# Altium PCB PCB_BDD.PcbDoc (part 2 of 2)
Units mm, origin at the board's own origin, x right, y up, seen from the top; angles counter-clockwise.
Board outline 40 x 35 mm, 2 copper layers (Top Layer, Bottom Layer); 30 components, 19 nets, 78 pads, 51 vias.
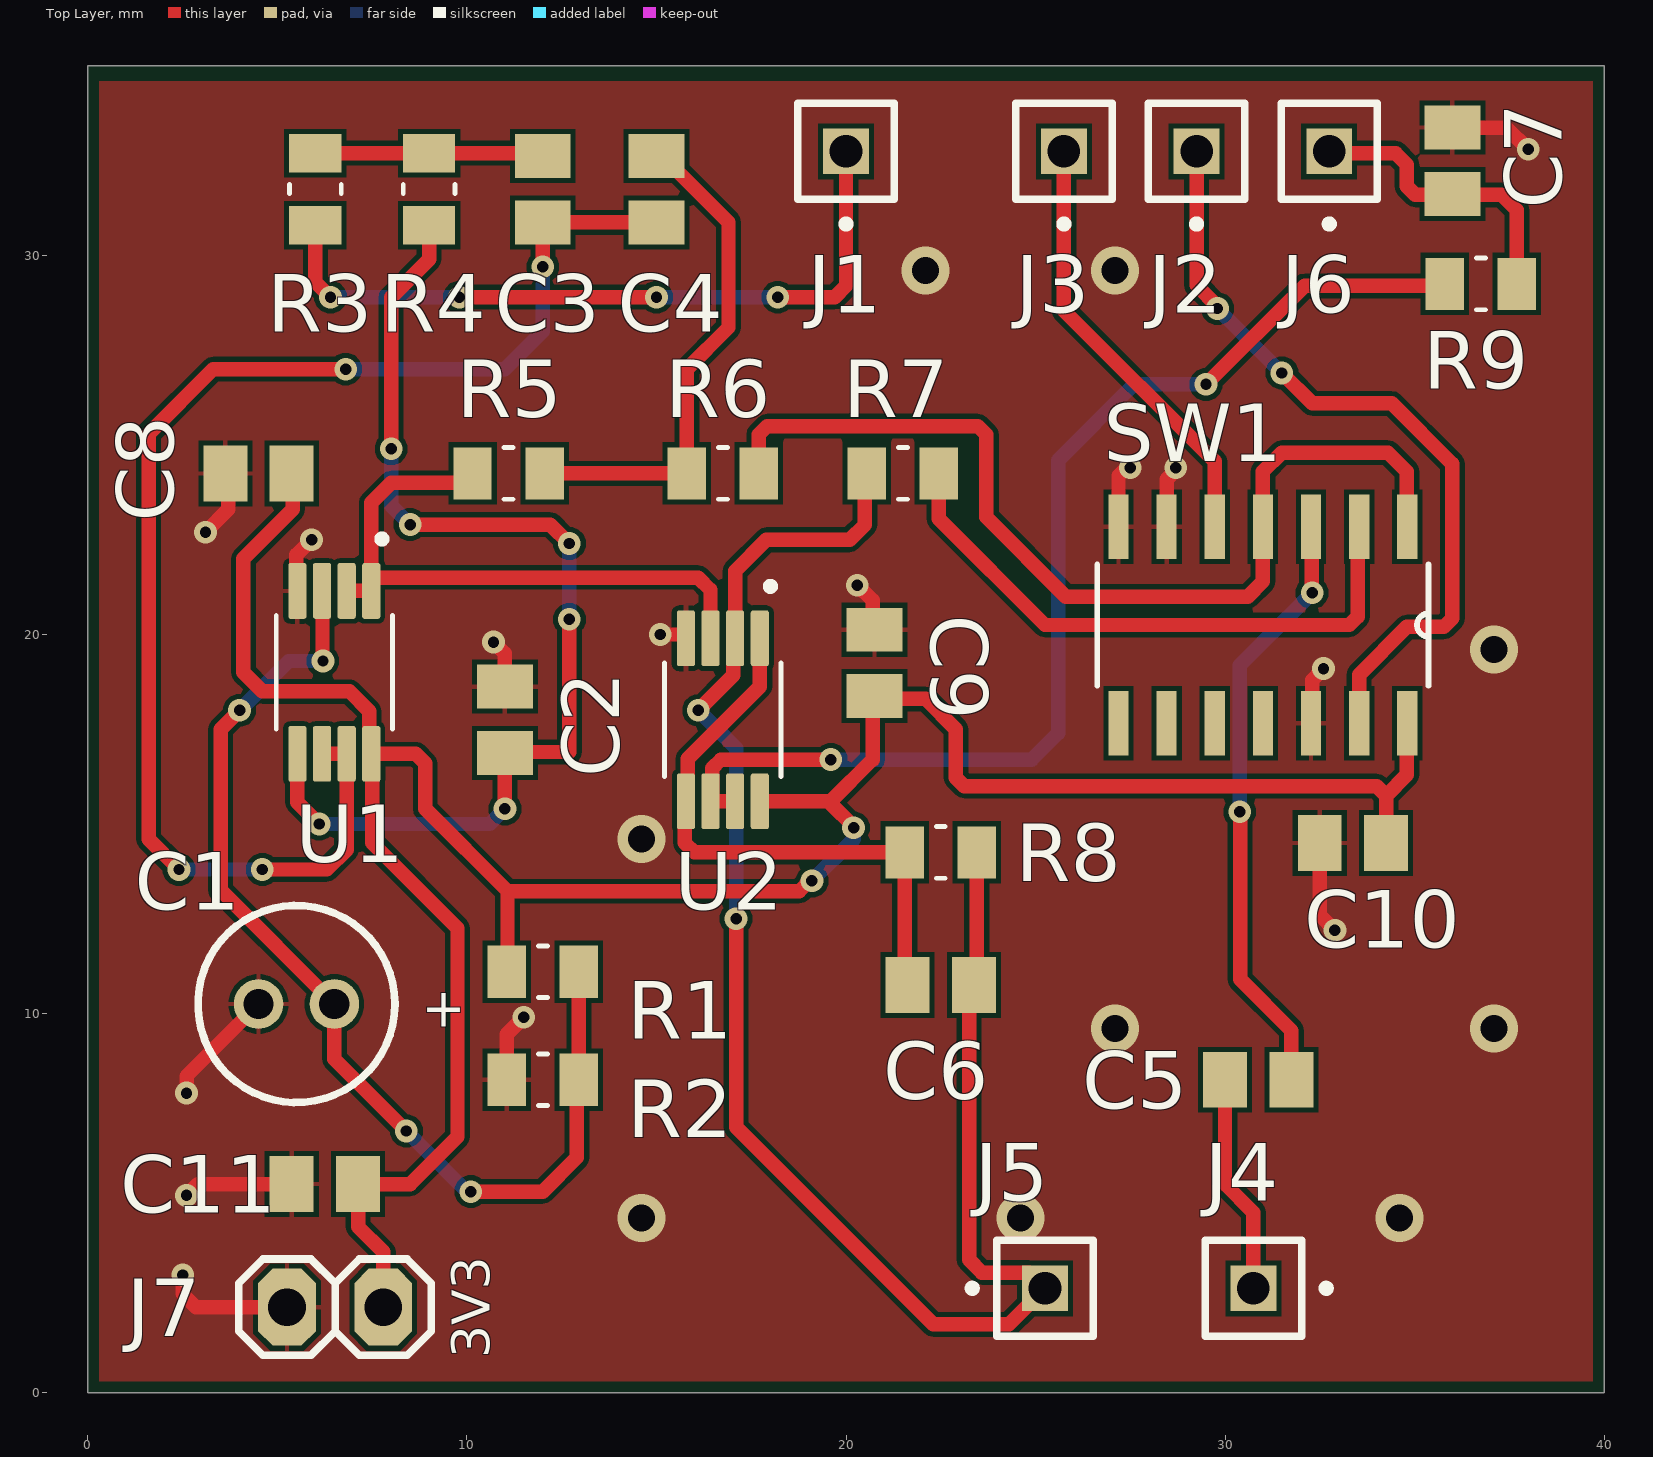
[diagram p0: Top Layer view]

## Part data (continued)
J7: "Female, 2 C, Straight .100\" CC; 3.20mm Tail, No Mounting; PBT, Phos. Bronze, 105 C", Color=Black, Current Rating=3A, Dielectric Material=Polyester, Manufacturer=Sullins, Max Operating Temperature=105°C, Min Operating Temperature=-40°C, Supplier Part Number=S7035-ND, Voltage Rating=250V, Category="Card Edge Connectors", ComponentLink1Description=https://datasheet.octopart.com:443/PPPC021LFBN-RC-Sullins-datasheet-138810743.pdf?src-supplier=IHS, ComponentLink1URL=https://datasheet.octopart.com:443/PPPC021LFBN-RC-Sullins-datasheet-138810743.pdf?src-supplier=IHS, ComponentLink2Description=https://datasheet.octopart.com:443/PPPC021LFBN-RC-Sullins-datasheet-83216130.pdf?src-supplier=Upverter, ComponentLink2URL=https://datasheet.octopart.com:443/PPPC021LFBN-RC-Sullins-datasheet-83216130.pdf?src-supplier=Upverter, ComponentLink3Description=https://datasheet.octopart.com:443/PPPC021LFBN-RC-Sullins-datasheet-41308905.pdf?src-supplier=Future+Electronics, ComponentLink3URL=https://datasheet.octopart.com:443/PPPC021LFBN-RC-Sullins-datasheet-41308905.pdf?src-supplier=Future+Electronics, ComponentLink4Description=https://datasheet.octopart.com:443/PPPC021LFBN-RC-Sullins-datasheet-12511165.pdf?src-supplier=Future+Electronics, ComponentLink4URL=https://datasheet.octopart.com:443/PPPC021LFBN-RC-Sullins-datasheet-12511165.pdf?src-supplier=Future+Electronics, Connector Type="Header, Socket", Contact Material="Gold, Nickel", Contact Plating=Gold, Export Control Classification Number (ECCN) Code=EAR99, Gender=Female, Harmonized Tariff Schedule (HTS) Code=8536.69.40.40, Height=8.7mm, Housing Material=Plastic, Introduction Date=2008-05-14, Lead Free="Lead Free", Length=5.58mm, Lifecycle Status=Production, Manufacturer Part Number=PPPC021LFBN-RC, Mounting Technology="Through Hole", Number of Contacts=2, Number of Positions=2, Number of Rows=1, Orientation=Straight, Packaging=Bulk, Pitch=2.54mm, Pricing="1=0.28, 10=0.234, 100=0.1984, 500=0.17706, 1000=0.16859, 5000=0.15048, 10000=0.1433 (USD)", REACH SVHC=Unaffected, RoHS=Compliant, Stock=38153, Supplier=DigiKey, Terminal Pitch=2.54mm, Termination=Solder, Width=2.5mm
R1 R2 R3 R4: library part RMCF0805FT10K0, "RES 10K OHM 1% 1/8W 0805", Case Code (Imperial)=0805, Case Code (Metric)=2012, Manufacturer="Stackpole Electronics", Manufacturer Package Identifier="0805 (2012 metric)", Max Operating Temperature=155°C, Max Power Dissipation=125mW, Min Operating Temperature=-55°C, Ratings=AEC-Q200, Supplier Part Number=RMCF0805FT10K0DKR-ND, Temperature Coefficient=100ppm/°C, Tolerance=1%, Voltage Rating=150V, Case/Package=0805, Category="Chip SMD Resistors", China RoHS=Non-Compliant, ComponentLink1Description=https://datasheet.octopart.com:443/RMCF0805FT10K0-Stackpole-Electronics-datasheet-182148065.pdf?src-supplier=IHS, ComponentLink1URL=https://datasheet.octopart.com:443/RMCF0805FT10K0-Stackpole-Electronics-datasheet-182148065.pdf?src-supplier=IHS, ComponentLink2Description=https://datasheet.octopart.com:443/RMCF0805FT10K0-Stackpole-Electronics-datasheet-12534581.pdf?src-supplier=Upverter, ComponentLink2URL=https://datasheet.octopart.com:443/RMCF0805FT10K0-Stackpole-Electronics-datasheet-12534581.pdf?src-supplier=Upverter, ComponentLink3Description=https://datasheet.octopart.com:443/RMCF0805FT10K0-Stackpole-Electronics-datasheet-12510902.pdf?src-supplier=Upverter, ComponentLink3URL=https://datasheet.octopart.com:443/RMCF0805FT10K0-Stackpole-Electronics-datasheet-12510902.pdf?src-supplier=Upverter, ComponentLink4Description=https://datasheet.octopart.com:443/RMCF0805FT10K0-Stackpole-Electronics-datasheet-28504820.pdf?src-supplier=Master+Electronics, ComponentLink4URL=https://datasheet.octopart.com:443/RMCF0805FT10K0-Stackpole-Electronics-datasheet-28504820.pdf?src-supplier=Master+Electronics, ComponentLink5Description=https://datasheet.octopart.com:443/RMCF0805FT10K0-Stackpole-Electronics-datasheet-141193804.pdf?src-supplier=Stackpole+Electronics, ComponentLink5URL=https://datasheet.octopart.com:443/RMCF0805FT10K0-Stackpole-Electronics-datasheet-141193804.pdf?src-supplier=Stackpole+Electronics, ComponentLink6Description=https://datasheet.octopart.com:443/RMCF0805FT10K0-Stackpole-Electronics-datasheet-62091608.pdf?src-supplier=Stackpole+Electronics, ComponentLink6URL=https://datasheet.octopart.com:443/RMCF0805FT10K0-Stackpole-Electronics-datasheet-62091608.pdf?src-supplier=Stackpole+Electronics, ComponentLink7Description=https://datasheet.octopart.com:443/RMCF0805FT10K0-Stackpole-Electronics-datasheet-10788263.pdf?src-supplier=Stackpole+Electronics, ComponentLink7URL=https://datasheet.octopart.com:443/RMCF0805FT10K0-Stackpole-Electronics-datasheet-10788263.pdf?src-supplier=Stackpole+Electronics, ComponentLink8Description=https://datasheet.octopart.com:443/RMCF0805FT10K0-Stackpole-Electronics-datasheet-154799224.pdf?src-supplier=JRH+Electronics, ComponentLink8URL=https://datasheet.octopart.com:443/RMCF0805FT10K0-Stackpole-Electronics-datasheet-154799224.pdf?src-supplier=JRH+Electronics, ComponentLink9Description=https://datasheet.octopart.com:443/RMCF0805FT10K0-Stackpole-Electronics-datasheet-11546843.pdf?src-supplier=Arrow+Electronics, ComponentLink9URL=https://datasheet.octopart.com:443/RMCF0805FT10K0-Stackpole-Electronics-datasheet-11546843.pdf?src-supplier=Arrow+Electronics, ComponentLink10Description=https://datasheet.octopart.com:443/RMCF0805FT10K0-Stackpole-Electronics-datasheet-11547379.pdf?src-supplier=Future+Electronics, ComponentLink10URL=https://datasheet.octopart.com:443/RMCF0805FT10K0-Stackpole-Electronics-datasheet-11547379.pdf?src-supplier=Future+Electronics, ComponentLink11Description=https://datasheet.octopart.com:443/RMCF0805FT10K0-Stackpole-Electronics-datasheet-8359789.pdf?src-supplier=Future+Electronics, ComponentLink11URL=https://datasheet.octopart.com:443/RMCF0805FT10K0-Stackpole-Electronics-datasheet-8359789.pdf?src-supplier=Future+Electronics, ComponentLink12Description=https://datasheet.octopart.com:443/RMCF0805FT10K0-Stackpole-Electronics-datasheet-8324226.pdf?src-supplier=Future+Electronics, ComponentLink12URL=https://datasheet.octopart.com:443/RMCF0805FT10K0-Stackpole-Electronics-datasheet-8324226.pdf?src-supplier=Future+Electronics, ComponentLink13Description=https://datasheet.octopart.com:443/RMCF0805FT10K0-Stackpole-Electronics-datasheet-8088878.pdf?src-supplier=Future+Electronics, ComponentLink13URL=https://datasheet.octopart.com:443/RMCF0805FT10K0-Stackpole-Electronics-datasheet-8088878.pdf?src-supplier=Future+Electronics, ComponentLink14Description=https://datasheet.octopart.com:443/RMCF0805FT10K0-Stackpole-Electronics-datasheet-5313682.pdf?src-supplier=Future+Electronics, ComponentLink14URL=https://datasheet.octopart.com:443/RMCF0805FT10K0-Stackpole-Electronics-datasheet-5313682.pdf?src-supplier=Future+Electronics, ComponentLink15Description=http://sigma.octopart.com:80/15940719/materials_sheet/Stackpole-Electronics-RMCF0805FT10K0.pdf?src-supplier=Compliance+Statements, ComponentLink15URL=http://sigma.octopart.com:80/15940719/materials_sheet/Stackpole-Electronics-RMCF0805FT10K0.pdf?src-supplier=Compliance+Statements, ComponentLink16Description=http://sigma.octopart.com:80/141158211/reach_statement/Stackpole-Electronics-RMCF0805FT10K0.pdf?src-supplier=Compliance+Statements, ComponentLink16URL=http://sigma.octopart.com:80/141158211/reach_statement/Stackpole-Electronics-RMCF0805FT10K0.pdf?src-supplier=Compliance+Statements, ComponentLink17Description=http://sigma.octopart.com:80/141158212/rohs_statement/Stackpole-Electronics-RMCF0805FT10K0.pdf?src-supplier=Compliance+Statements, ComponentLink17URL=http://sigma.octopart.com:80/141158212/rohs_statement/Stackpole-Electronics-RMCF0805FT10K0.pdf?src-supplier=Compliance+Statements, Composition="Thick Film", Contact Plating=Tin, Depth=1.25mm, Features="Automotive AEC-Q200", Height=500µm, Lead Free="Lead Free", Length=2mm, Lifecycle Status=Production, Manufacturer Part Number=RMCF0805FT10K0, Military Standard=Not, Mounting Technology="Surface Mount", Number of Terminals=2, Number of Terminations=2, Packaging="Cut Tape (CT)", Power Rating=125mW, Pricing="1=0.1, 10=0.027, 25=0.0196, 50=0.0156, 100=0.0127, 250=0.00988, 500=0.00824, 1000=0.00697 (USD)", Radiation Hardening=No, REACH SVHC=Unaffected, RoHS=Compliant, Schedule B="8533210045, 8533210045|8533210045, 8533210045|8533210045|8533210045, 8533210045|8533210045|8533210045|8533210045", Stock=3858245, Supplier=DigiKey, Width=1.25mm, Working Voltage=150V
R5 R6: library part RMCF0805FT100K0, "RES 100K OHM 1% 1/8W 0805", Case Code (Imperial)=0805, Case Code (Metric)=2012, Manufacturer="Stackpole Electronics", Manufacturer Package Identifier="0805 (2012 metric)", Manufacturer Part Number=RMCF0805FT10K0, Max Operating Temperature=155°C, Max Power Dissipation=125mW, Min Operating Temperature=-55°C, Ratings=AEC-Q200, Supplier Part Number=RMCF0805FT10K0DKR-ND, Temperature Coefficient=100ppm/°C, Tolerance=1%, Voltage Rating=150V, Case/Package=0805, Category="Chip SMD Resistors", China RoHS=Non-Compliant, ComponentLink1Description=https://datasheet.octopart.com:443/RMCF0805FT10K0-Stackpole-Electronics-datasheet-182148065.pdf?src-supplier=IHS, ComponentLink1URL=https://datasheet.octopart.com:443/RMCF0805FT10K0-Stackpole-Electronics-datasheet-182148065.pdf?src-supplier=IHS, ComponentLink2Description=https://datasheet.octopart.com:443/RMCF0805FT10K0-Stackpole-Electronics-datasheet-12534581.pdf?src-supplier=Upverter, ComponentLink2URL=https://datasheet.octopart.com:443/RMCF0805FT10K0-Stackpole-Electronics-datasheet-12534581.pdf?src-supplier=Upverter, ComponentLink3Description=https://datasheet.octopart.com:443/RMCF0805FT10K0-Stackpole-Electronics-datasheet-12510902.pdf?src-supplier=Upverter, ComponentLink3URL=https://datasheet.octopart.com:443/RMCF0805FT10K0-Stackpole-Electronics-datasheet-12510902.pdf?src-supplier=Upverter, ComponentLink4Description=https://datasheet.octopart.com:443/RMCF0805FT10K0-Stackpole-Electronics-datasheet-28504820.pdf?src-supplier=Master+Electronics, ComponentLink4URL=https://datasheet.octopart.com:443/RMCF0805FT10K0-Stackpole-Electronics-datasheet-28504820.pdf?src-supplier=Master+Electronics, ComponentLink5Description=https://datasheet.octopart.com:443/RMCF0805FT10K0-Stackpole-Electronics-datasheet-141193804.pdf?src-supplier=Stackpole+Electronics, ComponentLink5URL=https://datasheet.octopart.com:443/RMCF0805FT10K0-Stackpole-Electronics-datasheet-141193804.pdf?src-supplier=Stackpole+Electronics, ComponentLink6Description=https://datasheet.octopart.com:443/RMCF0805FT10K0-Stackpole-Electronics-datasheet-62091608.pdf?src-supplier=Stackpole+Electronics, ComponentLink6URL=https://datasheet.octopart.com:443/RMCF0805FT10K0-Stackpole-Electronics-datasheet-62091608.pdf?src-supplier=Stackpole+Electronics, ComponentLink7Description=https://datasheet.octopart.com:443/RMCF0805FT10K0-Stackpole-Electronics-datasheet-10788263.pdf?src-supplier=Stackpole+Electronics, ComponentLink7URL=https://datasheet.octopart.com:443/RMCF0805FT10K0-Stackpole-Electronics-datasheet-10788263.pdf?src-supplier=Stackpole+Electronics, ComponentLink8Description=https://datasheet.octopart.com:443/RMCF0805FT10K0-Stackpole-Electronics-datasheet-154799224.pdf?src-supplier=JRH+Electronics, ComponentLink8URL=https://datasheet.octopart.com:443/RMCF0805FT10K0-Stackpole-Electronics-datasheet-154799224.pdf?src-supplier=JRH+Electronics, ComponentLink9Description=https://datasheet.octopart.com:443/RMCF0805FT10K0-Stackpole-Electronics-datasheet-11546843.pdf?src-supplier=Arrow+Electronics, ComponentLink9URL=https://datasheet.octopart.com:443/RMCF0805FT10K0-Stackpole-Electronics-datasheet-11546843.pdf?src-supplier=Arrow+Electronics, ComponentLink10Description=https://datasheet.octopart.com:443/RMCF0805FT10K0-Stackpole-Electronics-datasheet-11547379.pdf?src-supplier=Future+Electronics, ComponentLink10URL=https://datasheet.octopart.com:443/RMCF0805FT10K0-Stackpole-Electronics-datasheet-11547379.pdf?src-supplier=Future+Electronics, ComponentLink11Description=https://datasheet.octopart.com:443/RMCF0805FT10K0-Stackpole-Electronics-datasheet-8359789.pdf?src-supplier=Future+Electronics, ComponentLink11URL=https://datasheet.octopart.com:443/RMCF0805FT10K0-Stackpole-Electronics-datasheet-8359789.pdf?src-supplier=Future+Electronics, ComponentLink12Description=https://datasheet.octopart.com:443/RMCF0805FT10K0-Stackpole-Electronics-datasheet-8324226.pdf?src-supplier=Future+Electronics, ComponentLink12URL=https://datasheet.octopart.com:443/RMCF0805FT10K0-Stackpole-Electronics-datasheet-8324226.pdf?src-supplier=Future+Electronics, ComponentLink13Description=https://datasheet.octopart.com:443/RMCF0805FT10K0-Stackpole-Electronics-datasheet-8088878.pdf?src-supplier=Future+Electronics, ComponentLink13URL=https://datasheet.octopart.com:443/RMCF0805FT10K0-Stackpole-Electronics-datasheet-8088878.pdf?src-supplier=Future+Electronics, ComponentLink14Description=https://datasheet.octopart.com:443/RMCF0805FT10K0-Stackpole-Electronics-datasheet-5313682.pdf?src-supplier=Future+Electronics, ComponentLink14URL=https://datasheet.octopart.com:443/RMCF0805FT10K0-Stackpole-Electronics-datasheet-5313682.pdf?src-supplier=Future+Electronics, ComponentLink15Description=http://sigma.octopart.com:80/15940719/materials_sheet/Stackpole-Electronics-RMCF0805FT10K0.pdf?src-supplier=Compliance+Statements, ComponentLink15URL=http://sigma.octopart.com:80/15940719/materials_sheet/Stackpole-Electronics-RMCF0805FT10K0.pdf?src-supplier=Compliance+Statements, ComponentLink16Description=http://sigma.octopart.com:80/141158211/reach_statement/Stackpole-Electronics-RMCF0805FT10K0.pdf?src-supplier=Compliance+Statements, ComponentLink16URL=http://sigma.octopart.com:80/141158211/reach_statement/Stackpole-Electronics-RMCF0805FT10K0.pdf?src-supplier=Compliance+Statements, ComponentLink17Description=http://sigma.octopart.com:80/141158212/rohs_statement/Stackpole-Electronics-RMCF0805FT10K0.pdf?src-supplier=Compliance+Statements, ComponentLink17URL=http://sigma.octopart.com:80/141158212/rohs_statement/Stackpole-Electronics-RMCF0805FT10K0.pdf?src-supplier=Compliance+Statements, Composition="Thick Film", Contact Plating=Tin, Depth=1.25mm, Features="Automotive AEC-Q200", Height=500µm, Lead Free="Lead Free", Length=2mm, Lifecycle Status=Production, Military Standard=Not, Mounting Technology="Surface Mount", Number of Terminals=2, Number of Terminations=2, Packaging="Cut Tape (CT)", Power Rating=125mW, Pricing="1=0.1, 10=0.027, 25=0.0196, 50=0.0156, 100=0.0127, 250=0.00988, 500=0.00824, 1000=0.00697 (USD)", Radiation Hardening=No, REACH SVHC=Unaffected, RoHS=Compliant, Schedule B="8533210045, 8533210045|8533210045, 8533210045|8533210045|8533210045, 8533210045|8533210045|8533210045|8533210045", Stock=3858245, Supplier=DigiKey, Width=1.25mm, Working Voltage=150V
R7 R8 R9: library part RMCF0805FT10K0, Package=None, Availability=Unavailable, MF="{'manufacturer': u'Stackpole Electronics Inc'}", MP=RMCF0805FT10K0, Price=None
SW1: "4 Circuit IC Switch 1:1 95Ohm 14-SO", Package="SO14-14 Nexperia USA Inc.", Check_prices=https://www.snapeda.com/parts/74HC4066D-Q100,118/Nexperia/view-part/?ref=eda, MF="Nexperia USA", MP=74HC4066D-Q100,118, SnapEDA_Link=https://www.snapeda.com/parts/74HC4066D-Q100,118/Nexperia/view-part/?ref=snap
U1 U2: "Op Amp Dual Low Offset Voltage Amplifier R-R I/O ±2.75V/5.5V 8-Pin VSSOP T/R", Case/Package=VSSOP, Input Bias Current=200pA, Input Offset Voltage (Vos)=10µV, Manufacturer="Texas Instruments", Manufacturer Lifecycle Status=ACTIVE, Max Dual Supply Voltage=2.75V, Max Operating Temperature=125°C, Max Supply Voltage=5.5V, Min Dual Supply Voltage=900mV, Min Operating Temperature=-40°C, Min Supply Voltage=1.8V, Nominal Supply Current=50µA, Operating Supply Current=17µA, Output Current=5mA, Power Supply Rejection Ratio (PSRR)=120dB, Supplier Part Number=296-22883-1-ND, Voltage Gain=130dB, Bandwidth=350kHz, Category="Amplifiers - Op Amps, Buffer, Instrumentation", Common Mode Rejection Ratio=106dB, ComponentLink1Description=https://sigma.octopart.com:443/178522223/technical_drawing/Texas-Instruments-OPA2333AIDGKR.pdf?src-supplier=Texas+Instruments, ComponentLink1URL=https://sigma.octopart.com:443/178522223/technical_drawing/Texas-Instruments-OPA2333AIDGKR.pdf?src-supplier=Texas+Instruments, ComponentLink2Description=https://octopart.com:443/opatz8j6/c1?t=SMwSThvPQdfEatth7KxTlaChlfAn7cTT6cjUaDOw74_NNjJekNKZsyDhtEuoS4eKOtTCAFoXNB_E0_suCzQRzP-DIx0-X5xPpe16GRNB2_TwyK3MTEefCYRPZXaRX4Ah5Et8Hp2tgH5a_c-EBlnpLi2u6G3ZeI9Yp4iXIdwQUDRBtk84yqC_eI37WOWlO_ryHnFZGceJsefqTsJ9uvmeBKHVoTMmyAxA9rG3m3YstuwKigXOvcpgbcNt11nNHF3DAIlkU7pXQ2myhrrwPrPO63mDfxIToaVVd93B2pkmMI_lgIrjcud5OpkULzyK-ZMWFB4P2qgS7zv3tgV9E1cMDir58flv6M2fK5waIwwdQmCxsepTno10BpDtRzBXMqLoPGYrqQ&src-supplier=Texas+Instruments, ComponentLink2URL=https://octopart.com:443/opatz8j6/c1?t=SMwSThvPQdfEatth7KxTlaChlfAn7cTT6cjUaDOw74_NNjJekNKZsyDhtEuoS4eKOtTCAFoXNB_E0_suCzQRzP-DIx0-X5xPpe16GRNB2_TwyK3MTEefCYRPZXaRX4Ah5Et8Hp2tgH5a_c-EBlnpLi2u6G3ZeI9Yp4iXIdwQUDRBtk84yqC_eI37WOWlO_ryHnFZGceJsefqTsJ9uvmeBKHVoTMmyAxA9rG3m3YstuwKigXOvcpgbcNt11nNHF3DAIlkU7pXQ2myhrrwPrPO63mDfxIToaVVd93B2pkmMI_lgIrjcud5OpkULzyK-ZMWFB4P2qgS7zv3tgV9E1cMDir58flv6M2fK5waIwwdQmCxsepTno10BpDtRzBXMqLoPGYrqQ&src-supplier=Texas+Instruments, ComponentLink3Description=https://datasheet.octopart.com:443/OPA2333AIDGKR-Texas-Instruments-datasheet-37724099.pdf?src-supplier=Texas+Instruments, ComponentLink3URL=https://datasheet.octopart.com:443/OPA2333AIDGKR-Texas-Instruments-datasheet-37724099.pdf?src-supplier=Texas+Instruments, ComponentLink4Description=https://datasheet.octopart.com:443/OPA2333AIDGKR-Texas-Instruments-datasheet-21095362.pdf?src-supplier=Texas+Instruments, ComponentLink4URL=https://datasheet.octopart.com:443/OPA2333AIDGKR-Texas-Instruments-datasheet-21095362.pdf?src-supplier=Texas+Instruments, ComponentLink5Description=https://datasheet.octopart.com:443/OPA2333AIDGKR-Texas-Instruments-datasheet-152276.pdf?src-supplier=Texas+Instruments, ComponentLink5URL=https://datasheet.octopart.com:443/OPA2333AIDGKR-Texas-Instruments-datasheet-152276.pdf?src-supplier=Texas+Instruments, ComponentLink6Description=https://sigma.octopart.com:443/49250154/technical_drawing/Texas-Instruments-OPA2333AIDGKR.pdf?src-supplier=Texas+Instruments, ComponentLink6URL=https://sigma.octopart.com:443/49250154/technical_drawing/Texas-Instruments-OPA2333AIDGKR.pdf?src-supplier=Texas+Instruments, ComponentLink7Description=https://datasheet.octopart.com:443/OPA2333AIDGKR-Texas-Instruments-datasheet-82492514.pdf?src-supplier=Newark, ComponentLink7URL=https://datasheet.octopart.com:443/OPA2333AIDGKR-Texas-Instruments-datasheet-82492514.pdf?src-supplier=Newark, ComponentLink8Description=https://datasheet.octopart.com:443/OPA2333AIDGKR-Texas-Instruments-datasheet-17021844.pdf?src-supplier=Newark, ComponentLink8URL=https://datasheet.octopart.com:443/OPA2333AIDGKR-Texas-Instruments-datasheet-17021844.pdf?src-supplier=Newark, ComponentLink9Description=https://datasheet.octopart.com:443/OPA2333AIDGKR-Texas-Instruments-datasheet-23768453.pdf?src-supplier=Newark, ComponentLink9URL=https://datasheet.octopart.com:443/OPA2333AIDGKR-Texas-Instruments-datasheet-23768453.pdf?src-supplier=Newark, ComponentLink10Description=https://datasheet.octopart.com:443/OPA2333AIDGKR-Texas-Instruments-datasheet-165804235.pdf?src-supplier=LCSC, ComponentLink10URL=https://datasheet.octopart.com:443/OPA2333AIDGKR-Texas-Instruments-datasheet-165804235.pdf?src-supplier=LCSC, ComponentLink11Description=https://datasheet.octopart.com:443/OPA2333AIDGKR-Texas-Instruments-datasheet-159115573.pdf?src-supplier=LCSC, ComponentLink11URL=https://datasheet.octopart.com:443/OPA2333AIDGKR-Texas-Instruments-datasheet-159115573.pdf?src-supplier=LCSC, ComponentLink12Description=https://datasheet.octopart.com:443/OPA2333AIDGKR-Texas-Instruments-datasheet-164415937.pdf?src-supplier=SHENGYU+ELECTRONICS, ComponentLink12URL=https://datasheet.octopart.com:443/OPA2333AIDGKR-Texas-Instruments-datasheet-164415937.pdf?src-supplier=SHENGYU+ELECTRONICS, ComponentLink13Description=https://datasheet.octopart.com:443/OPA2333AIDGKR-Texas-Instruments-datasheet-165082070.pdf?src-supplier=Burklin+Elektronik, ComponentLink13URL=https://datasheet.octopart.com:443/OPA2333AIDGKR-Texas-Instruments-datasheet-165082070.pdf?src-supplier=Burklin+Elektronik, ComponentLink14Description=https://datasheet.octopart.com:443/OPA2333AIDGKR-Texas-Instruments-datasheet-14137206.pdf?src-supplier=iiiC, ComponentLink14URL=https://datasheet.octopart.com:443/OPA2333AIDGKR-Texas-Instruments-datasheet-14137206.pdf?src-supplier=iiiC, ComponentLink15Description=http://sigma.octopart.com:80/reach_statement/Texas-Instruments-company-64.pdf?src-supplier=Compliance+Statements, ComponentLink15URL=http://sigma.octopart.com:80/reach_statement/Texas-Instruments-company-64.pdf?src-supplier=Compliance+Statements, ComponentLink16Description=http://sigma.octopart.com:80/conflict_mineral_statement/Texas-Instruments-company-63.pdf?src-supplier=Compliance+Statements, ComponentLink16URL=http://sigma.octopart.com:80/conflict_mineral_statement/Texas-Instruments-company-63.pdf?src-supplier=Compliance+Statements, Contact Plating=Gold, Gain Bandwidth Product=350kHz, Height=0m, Lead Free="Lead Free", Length=3mm, Lifecycle Status=Production, Manufacturer Part Number=OPA2333AIDGKR, Mounting Technology="Surface Mount", Number of Amplifiers=2, Number of Channels=2, Number of Circuits=2, Number of Elements=2, Operating Supply Voltage=2.75V, Output Current per Channel=5mA, Pins=8, Pricing="1=3.57, 10=2.685, 25=2.4644, 100=2.221, 250=2.105, 500=2.08222 (USD)", Radiation Hardening=No, REACH SVHC=Unaffected, RoHS=Compliant, Schedule B="8542330000, 8542330000|8542330000|8542330000|8542330000|8542330000|8542330000|8542330000|8542330000|8542330000|8542330000|8542330000|8542330000|8542330000|8542330000|8542330000|8542330000|8542330000|8542330000|8542330000|8542330000|8542330000|8542330000|8542330000|85", Slew Rate=0.16V/µs, Stock=10638, Supplier=DigiKey, Thickness=970µm, Width=3mm

## Via types
v1: diameter 0.6, hole 0.3, Top Layer to Bottom Layer, tented both sides, 42 vias
v2: diameter 1.27, hole 0.711, Top Layer to Bottom Layer, 9 vias

## Nets (pads, with @x,y where several pads share a name; then routed paths per layer and width w, separated by ;. In a path a pad name is that pad's centre, name@x,y a point inside that pad or via, vN(x,y) a via of type N, cw(c..) or ccw(c..) an arc to the next point about the centre after c; other vN are vias at no path point)
3V3: C8.2 C9.2 C10.1 C11.2 J7.2 R1.2 SW1.14 U1.8 U2.8 | length 71.1
  Top Layer w0.381: C8.2 5.4,24.225 5.4,23.3 4.1,22 4.1,19 4.6,18.5 6.9,18.5 7.426,17.974 7.426,16.899 U1.8 ; J7.2 7.79,3.71 7.125,4.375 C11.2 8.5,5.5 9.75,6.75 9.75,12.25 7.5,14.5 7.5,16.825 U1.8 ; R1.2@11.069,11.119 11.069,13.231 ; U2.8 19.6,15.6 ; v1(19.1,13.5) 19.041,13.5 18.772,13.231 11.069,13.231 ; v1(20.2,14.9) 20.2,14.932 19.6,15.532 19.6,15.6 ; C10.1 34.25,15.75 ; SW1.14 34.8,17.649 34.8,16.3 34.25,15.75 ; U1.8 8.65,16.85 8.9,16.6 8.9,15.4 11.069,13.231 ; 19.6,15.6 20.7,16.7 20.7,18.325 C9.2 20.825,18.3 22.1,18.3 22.9,17.5 22.9,16.223 23.123,16 34,16 34.25,15.75
  Bottom Layer w0.381: v1(19.1,13.5) 20.2,14.6 v1(20.2,14.9)
+IN_A: C1.1 R1.1 R2.2 U1.3 | length 28.4
  Top Layer w0.381: v1(4,18) 3.5,17.5 3.5,13.25 C1.1 6.5,8.8 v1(8.4,6.9) ; U1.3 6.187,21.138 6.187,19.313 v1(6.2,19.3) ; v1(10.1,5.3) 12,5.3 12.9,6.2 12.9,8.2 R2.2 R1.1
  Bottom Layer w0.381: v1(4,18) 5.3,19.3 v1(6.2,19.3) ; v1(8.4,6.9) 10,5.3 v1(10.1,5.3)
+IN_A1: R5.1 U1.1 U1.2 U2.3 | length 16.6
  Top Layer w0.381: U1.2 U1.1 ; R5.1 9.898,24 8,24 7.475,23.475 U1.1 ; U2.3 16.425,21.175 16.1,21.5 7.525,21.5 7.475,21.451 U1.1
+IN_B: C2.2 R4.1 U1.5 | length 28.8
  Top Layer w0.381: U1.5 5.525,15.575 v1(6.1,15) ; v1(8,24.9) 8,28.9 9,29.9 R4.1 ; v1(8.5,22.9) 12.2,22.9 v1(12.7,22.4) ; v1(11,15.4) C2.2 11.025,16.9 12.7,16.9 v1(12.7,20.4)
  Bottom Layer w0.381: v1(6.1,15) 10.6,15 v1(11,15.4) ; v1(8,24.9) 8,23.4 v1(8.5,22.9) ; v1(12.7,20.4) v1(12.7,22.4)
+IN_B1: C6.2 R8.2 U2.1 U2.5 | length 15.7
  Top Layer w0.381: U2.1 17.725,18.625 15.825,16.725 15.825,15.65 U2.5 15.75,15.575 15.75,14.5 16,14.25 R8.2 21.55,10.825 C6.2
-IN_A1: C6.1 J5.01 R7.2 R8.1 U2.2 | length 44.6
  Top Layer w0.381: v1(16.1,18) 17.025,18.925 17.025,19.851 U2.2 17.075,21.675 17.9,22.5 20.1,22.5 20.5,22.9 20.5,24.2 R7.2 ; v1(17.1,12.5) 17.1,7 21.8,2.3 22.3,1.8 24.3,1.8 J5.01 24.835,3.164 23.586,3.164 23.25,3.5 23.25,10.625 C6.1 23.45,10.825 R8.1
  Bottom Layer w0.381: v1(16.1,18) 17.1,17 v1(17.1,12.5)
-IN_B: C3.1 C4.1 U1.6 U1.7 | length 37
  Top Layer w0.381: v1(2.4,13.8) 1.6,14.6 1.6,25.3 3.3,27 v1(6.8,27) ; v1(4.6,13.8) 6.3,13.8 6.825,14.325 U1.7 U1.6 ; v1(12,29.7) C3.1 C4.1
  Bottom Layer w0.381: v1(2.4,13.8) v1(4.6,13.8) ; v1(6.8,27) 11,27 12,28 v1(12,29.7)
-IN_B1: R9.1 U2.6 U2.7 | length 30.4
  Top Layer w0.381: U2.7 U2.6 16.475,15.65 16.475,16.475 16.7,16.7 v1(19.6,16.7) ; v1(29.5,26.6) 32.1,29.2 35.75,29.2 R9.1
  Bottom Layer w0.381: v1(19.6,16.7) 24.9,16.7 25.6,17.4 25.6,24.6 27.6,26.6 v1(29.5,26.6)
EXC: R6.1 SW1.1 SW1.4 | length 26.3
  Top Layer w0.381: R6.1 17.7,25.277 17.923,25.5 23.477,25.5 23.7,25.277 23.7,23.1 25.8,21 30.6,21 31,21.4 SW1.4 31,24.3 31.5,24.8 34.3,24.8 34.8,24.3 34.8,22.851 SW1.1
GND: C1.2 C2.1 C7.1 C8.1 C9.1 C10.2 C11.1 J7.1 R2.1 SW1.6 SW1.7 SW1.12 U1.4 U2.4 | length 27.5
  Top Layer w0.381: v1(2.5,3.1) 2.5,2.6 2.85,2.25 J7.1 ; v1(2.6,5.2) 2.9,5.5 C11.1 ; v1(2.6,7.9) 2.6,8.35 C1.2 ; v1(3.1,22.7) 3.7,23.3 3.7,24.175 C8.1 ; U1.4 5.5,21.175 5.5,22.1 v1(5.9,22.5) ; v1(10.7,19.8) 11,19.5 C2.1 ; R2.1 11.05,9.45 v1(11.5,9.9) ; v1(15.1,20) 15.726,20 15.775,19.951 U2.4 ; v1(20.3,21.3) 20.7,20.9 20.7,20.175 C9.1 ; SW1.7 27.19,24.19 v1@27.3,24.3 ; SW1.6 28.46,24.101 28.7,24.341 v1(28.7,24.4) ; SW1.12 32.3,17.689 32.3,18.8 32.5,19 v1(32.6,19.1) ; C10.2 32.5,12.6 v1(32.9,12.2) ; C7.1 37.425,33.375 v1(38,32.8)
  other v1: 27.5,24.4
  other v2: 14.6,4.6 24.6,4.6 34.6,4.6 27.1,9.6 37.1,9.6 14.6,14.6 37.1,19.6 22.1,29.6 27.1,29.6
NetC3_2: C3.2 R3.1 R4.2 | length 6
  Top Layer w0.381: R3.1 R4.2 11.925,32.7 C3.2
NetC4_2: C4.2 R5.2 R6.2 | length 13.5
  Top Layer w0.381: R5.2 R6.2 15.8,27 16.9,28.1 16.9,30.88 15.155,32.625 C4.2
NetC5_1: C5.1 SW1.3 | length 16
  Top Layer w0.381: v1(30.388,15.322) 30.388,15.312 30.4,15.3 30.4,10.9 31.75,9.55 C5.1 ; SW1.3 32.285,22.826 32.285,21.115 v1(32.3,21.1)
  Bottom Layer w0.381: v1(30.388,15.322) 30.388,19.188 v1(32.3,21.1)
NetC5_2: C5.2 J4.01 | length 5.8
  Top Layer w0.381: C5.2 30,5.5 30.75,4.75 J4.01
NetC7_2: C7.2 J6.01 R9.2 | length 7.9
  Top Layer w0.381: J6.01 32.8,32.7 34.5,32.7 34.8,32.4 34.8,31.823 35.023,31.6 35.975,31.6 C7.2 36.025,31.6 37.3,31.6 37.7,31.2 R9.2
NetJ1_01: J1.01 R3.2 | length 19.3
  Top Layer w0.381: R3.2 6,29.3 v1(6.4,28.9) ; v1(9.8,28.9) v1(15,28.9) ; v1(18.2,28.9) 19.7,28.9 20,29.2 J1.01
  Bottom Layer w0.381: v1(6.4,28.9) v1(9.8,28.9) ; v1(15,28.9) v1(18.2,28.9)
NetJ2_01: J2.01 SW1.13 | length 20.8
  Top Layer w0.381: J2.01 29.25,29.209 29.8,28.659 v1(29.8,28.6) ; v1(31.5,26.9) 32.3,26.1 34.4,26.1 36,24.5 36,20.423 35.777,20.2 34.8,20.2 33.54,18.94 SW1.13
  Bottom Layer w0.381: J2.01@29.2,32.7 J2.01 ; v1(29.8,28.6) v1(31.5,26.9)
NetJ3_01: J3.01 SW1.5 | length 11.6
  Top Layer w0.381: J3.01 25.75,28.55 29.73,24.57 SW1.5
NetR7_1: R7.1 SW1.2 | length 16
  Top Layer w0.381: R7.1 22.45,23.05 25.25,20.25 33.277,20.25 33.5,20.473 33.5,22.881 SW1.2
pads on no net: SW1.8 SW1.9 SW1.10 SW1.11

## Polygon pours and split planes (outlines as drawn)
GND on Bottom Layer "GND_L02_P000" (solid, remove dead copper, pour order 0): 39.6,34.6 39.6,0.3 0.2,0.3 0.2,34.6 0.5,34.6 0.2,34.6 0.5,34.6
GND on Top Layer "NONET_L01_P-001" (solid, remove dead copper, pour order 5): 0.3,34.6 0.3,0.3 39.7,0.3 39.7,34.6

## Silkscreen, mask and mechanical layers (free items; w line width, h text height)
Top Overlay:
  text "3V3" at 10.6,0.9 h1 r90
Mechanical 1:
  the board outline again, w0.2

## Text inside footprints (layer, text, board x,y; h text height)
C1: Top Overlay "+" at 8.8,9.65 h1.02; Mechanical 13 "+" at 8.8,9.65 h1.02